# Altium PCB STAND_SSD_2246(CPU).PcbDoc (part 7 of 7)
Units mm, origin at the board's own origin, x right, y up, seen from the top; angles counter-clockwise.
Board outline 70 x 170 mm, 8 copper layers (L1:Top, L2:GND, L3:Sig, L4:VCC, L5:Sig, L6:Sig, L7:GND, L8:Bot), stack 1.112 mm thick; 174 components, 271 nets, 1671 pads, 771 vias.
Unrouted connection lines stored in the file: 138.
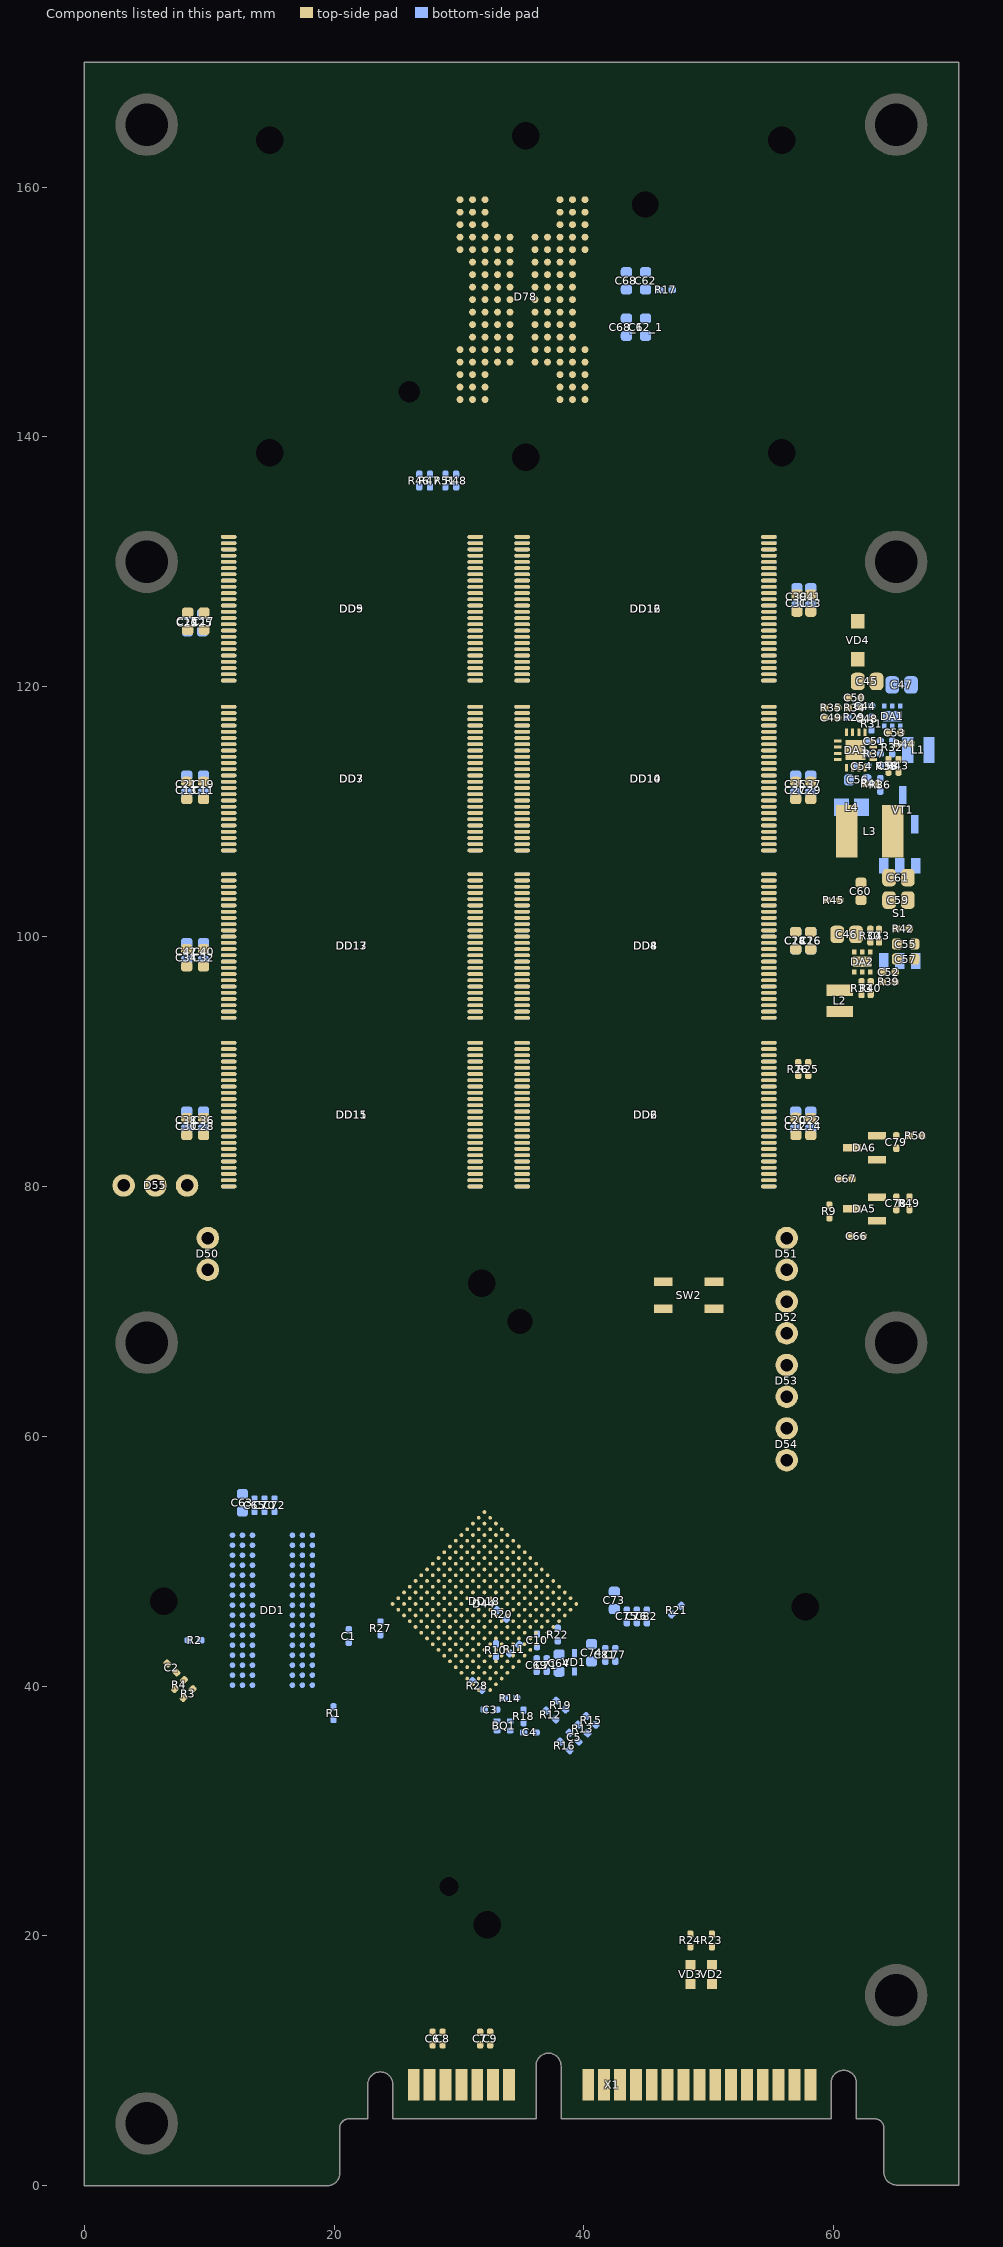
[diagram p13: the components of this part, seen from the top]

## Silkscreen, mask and mechanical layers (free items; w line width, h text height) (continued)
Bottom Overlay:
  circle w0.2: c26.018,143.613 r1.6
  circle w0.2: c44.908,158.613 r1.6
  circle w0.2: c35.338,138.393 r2.2
  circle w0.2: c55.838,138.743 r2.2
  circle w0.2: c55.838,163.743 r2.2
  circle w0.2: c35.338,164.093 r2.2
  circle w0.2: c14.838,138.743 r2.2
  circle w0.2: c14.838,163.743 r2.2
  circle w0.2: c65,165 r3
  circle w0.2: c5,165 r3
  circle w0.2: c34.868,69.207 r1.6
  circle w0.2: c29.211,23.952 r1.6
  circle w0.2: c32.252,20.911 r2.2
  circle w0.2: c6.372,46.791 r2.2
  circle w0.2: c31.828,72.247 r2.2
  circle w0.2: c57.708,46.367 r2.2
  circle w0.2: c65,130 r3
  circle w0.2: c5,130 r3
  circle w0.2: c65,67.5 r3
  circle w0.2: c65.002,15.263 r3
  circle w0.2: c5,5 r3
  circle w0.2: c5,67.5 r3
  lines w0.1: 39.325,38.534 39.487,38.696 41.087,38.696
  lines w0.127: 10.56,39.579 10.56,52.579 19.56,52.579 19.56,39.579 10.56,39.579
  text "DNP" at 26.382,133.026 h1.4 r270
  text "DNP" at 28.467,133.026 h1.4 r270
Board:
  the board outline again, w0.1
Mechanical 13:
  lines w0.1: 3.693,67.698 38.868,67.698 ; 38.868,10.698 38.868,67.698 ; 38.868,124.098 38.868,67.698 ; 77.293,67.698 38.868,67.698